# Altium PCB PCB1.PcbDoc (part 4 of 4)
Units mm, origin at the board's own origin, x right, y up, seen from the top; angles counter-clockwise.
Board outline 134.12 x 116.9 mm, 4 copper layers (Top Layer, Layer 1, Layer 2, Bottom Layer), stack 1.312 mm thick; 317 components, 155 nets, 807 pads, 898 vias.
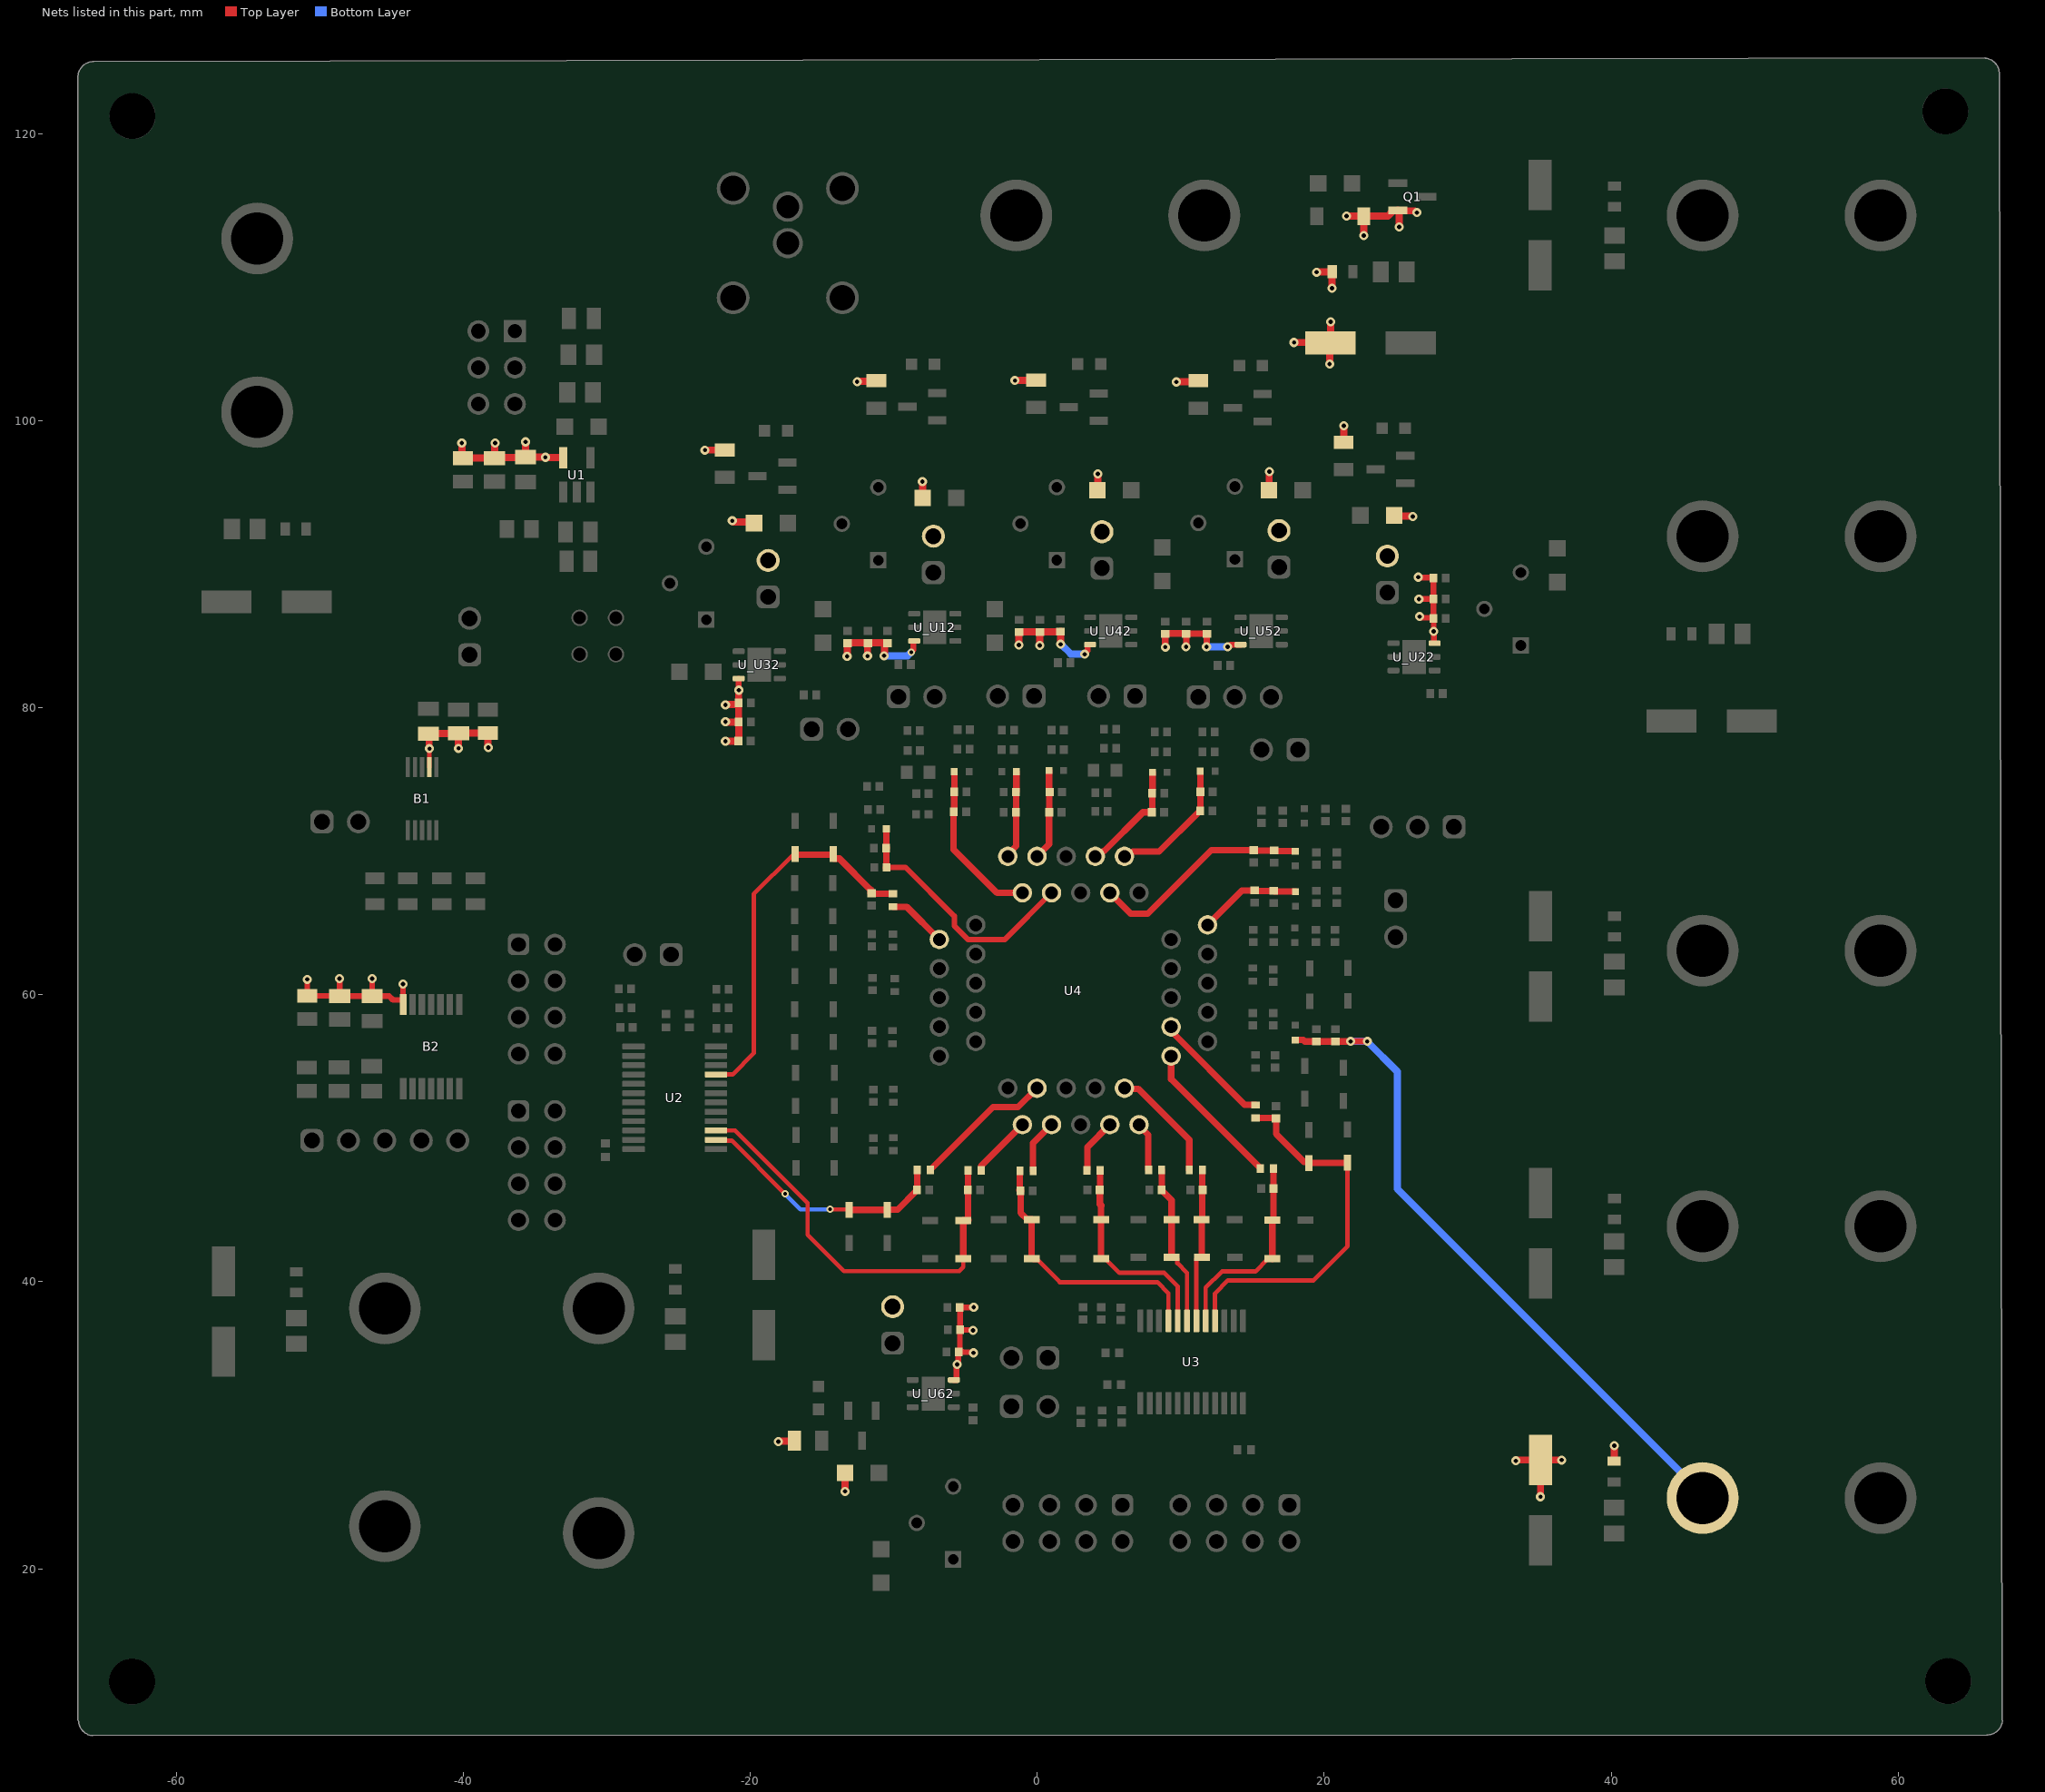
[diagram p6: the nets of this part, all layers, seen from the top]

## Via types
v1: diameter 0.635, hole 0.305, Top Layer to Bottom Layer, 880 vias
v2: diameter 0.508, hole 0.254, Top Layer to Bottom Layer, 17 vias
v3: diameter 0.504, hole 0.254, Top Layer to Bottom Layer, 1 vias

## Nets (pads, with @x,y where several pads share a name; then routed paths per layer and width w, separated by ;. In a path a pad name is that pad's centre, name@x,y a point inside that pad or via, vN(x,y) a via of type N, cw(c..) or ccw(c..) an arc to the next point about the centre after c; other vN are vias at no path point) (continued)
VDD_5V_U1: B1.2 B2.14 C3.2 C4.2 C5.2 C6.2 C7.2 C8.2 C11.2 C12.2 C75.1 C81.2 C_U183.2 C_U184.2 C_U185.2 C_U283.2 C_U284.2 C_U285.2 C_U383.2 C_U384.2 C_U385.2 C_U483.2 C_U484.2 C_U485.2 C_U583.2 C_U584.2 C_U585.2 C_U683.2 C_U684.2 C_U685.2 D10.1 J_U127.2 J_U227.2 J_U327.2 J_U427.2 J_U527.2 J_U627.2 Q1.2 R40.2 R_U131.1 R_U132.2 R_U231.1 R_U232.2 R_U331.1 R_U332.2 R_U431.1 R_U432.2 R_U531.1 R_U532.2 R_U631.1 R_U632.2 U1.5 U_U12.6 U_U22.6 U_U32.6 U_U42.6 U_U52.6 U_U62.6 | length 109.7
  Top Layer w0.3: B1.2@-42.363,75.865 -42.363,77.137 v1(-42.35,77.15)
  Top Layer w0.4: v1(-50.875,61.075) -50.866,61.066 -50.866,59.936 -50.852,59.922 -48.722,59.922 C11.2@-48.65,59.85 ; v1(-48.625,61.125) -48.616,61.116 -48.616,59.866 C11.2@-48.55,59.8 ; C11.2@-48.607,59.917 C11.2@-48.607,59.917 C81.2@-46.351,59.916 ; v1(-46.35,61.125) -46.351,61.124 -46.351,60.001 C81.2@-46.265,59.915 ; C81.2@-46.113,59.915 C81.2@-46.353,59.915 -46.348,59.91 -45.16,59.91 -44.89,59.64 -44.208,59.64 -44.183,59.615 B2.14@-44.183,59.326 ; B2.14@-44.2,59.814 v1(-44.2,60.75) ; v1@-20.805,81.23 U_U32.6@-20.805,82.035 ; v2(-8.775,83.875) v2(-8.775,83.875) -8.633,84.019 U_U12.6@-8.633,84.602 ; U_U62.6@-5.809,33.16 -5.62,33.16 -5.62,34.205 -5.506,34.319 -5.506,34.789 -5.495,34.8 ; C_U685.2@-5.45,35.15 -5.395,35.205 C_U684.2@-5.395,36.65 ; C_U683.2@-5.425,38.2 -5.413,38.212 -4.438,38.212 v1(-4.425,38.225) ; C_U685.2@-5.398,35.125 -5.398,35.121 -5.18,35.121 -5.154,35.095 -4.495,35.095 v1(-4.45,35.05) ; C_U684.2@-5.373,36.65 C_U683.2@-5.373,38.1 ; C_U684.2@-5.325,36.675 -5.301,36.651 -4.501,36.651 v1(-4.475,36.625) ; v1(3.3,83.725) 3.3,83.762 3.514,83.976 U_U42.6@3.514,84.351 ; v1(13.275,84.25) 13.339,84.25 13.485,84.397 U_U52.6@14.172,84.397 ; v1(26.55,89.1) 26.588,89.062 27.588,89.062 C_U283.2@27.626,89.024 ; v1(26.6,87.575) 26.609,87.584 27.591,87.584 C_U284.2@27.6,87.575 ; v1(26.65,86.35) 26.714,86.35 26.789,86.275 27.55,86.275 C_U285.2@27.575,86.25 ; C_U284.2@27.608,87.558 27.608,86.236 27.625,86.219 v1(27.625,85.325) 27.651,85.299 U_U22.6@27.651,84.54 ; C_U284.2@27.608,87.594 27.608,89.007 C_U283.2@27.63,89.029
  Top Layer w0.45: v1(8.925,84.225) C_U583.2@8.925,85.176 ; C_U583.2@8.926,85.175 C_U584.2@10.35,85.175 ; v1(10.375,84.25) 10.382,84.257 10.382,85.143 C_U584.2@10.35,85.175 ; C_U584.2@10.375,85.175 C_U584.2@10.35,85.175 ; C_U584.2@10.382,85.167 10.389,85.174 C_U585.2@11.799,85.174 ; v1(11.8,84.25) 11.812,84.262 11.812,85.163 C_U585.2@11.825,85.176
  Top Layer w0.5: v1@-42.376,77.151 -42.376,78.131 C8.2@-42.425,78.18 -42.4,78.205 C7.2@-40.325,78.205 ; v1@-40.3,77.175 -40.325,77.2 C7.2@-40.325,78.205 ; C7.2@-40.15,78.25 C7.2@-40.165,78.235 ; v1(-40.1,98.45) -40.074,98.424 -40.074,97.574 C3.2@-40.025,97.525 ; C3.2@-40.025,97.385 -40.02,97.39 -37.915,97.39 C4.2@-37.9,97.375 ; v1@-38.3,77.275 -38.275,77.3 C6.2@-38.275,78.235 ; C6.2@-38.275,78.24 C6.2@-38.275,78.235 ; C6.2@-38.1,78.225 -38.11,78.235 C6.2@-38.275,78.235 ; C4.2@-37.825,97.395 -37.788,97.432 -35.688,97.432 C5.2@-35.65,97.47 ; v1(-37.775,98.45) -37.8,98.425 -37.8,97.525 C4.2@-37.725,97.45 ; C5.2@-35.65,97.55 v1(-35.65,98.525) ; C5.2@-35.575,97.4 -35.512,97.463 -35.51,97.46 -34.285,97.46 -34.256,97.431 -33.057,97.431 U1.5@-33.057,97.5 ; v1(-23.15,97.95) -23.147,97.953 -21.955,97.953 R_U332.2@-21.952,97.95 ; v1(-21.725,77.675) C_U383.2@-20.827,77.675 C_U383.2@-20.827,77.675 ; v1(-21.725,79.025) -21.699,78.999 C_U384.2@-20.802,78.999 ; v1(-21.725,80.2) -21.699,80.226 -20.949,80.226 -20.9,80.275 -20.827,80.275 -20.825,80.277 C_U385.2@-20.825,80.35 ; v1(-21.25,93.025) -21.168,92.943 -19.812,92.943 R_U331.1@-19.73,92.862 ; C_U384.2@-20.825,79.1 C_U384.2@-20.8,79.075 ; C_U385.2@-20.809,80.528 -20.809,79.098 C_U384.2@-20.808,79.099 ; v1@-20.805,81.225 -20.805,80.545 C_U385.2@-20.787,80.528 ; C_U383.2@-20.802,77.7 C_U384.2@-20.802,78.999 ; C_U384.2@-20.802,79.025 C_U384.2@-20.802,78.999 ; C_U384.2@-20.775,78.975 -20.799,78.999 C_U384.2@-20.802,78.999 ; v1(-18.05,28.875) -18.024,28.901 -16.844,28.901 R_U632.2@-16.83,28.914 ; v1(-13.4,25.4) -13.392,25.408 -13.392,26.667 R_U631.1@-13.384,26.675 ; v1(-13.25,83.575) -13.233,83.592 -13.233,84.498 -13.211,84.52 -11.82,84.52 C_U184.2@-11.802,84.502 ; v1(-12.55,102.725) -12.524,102.751 -11.268,102.751 R_U132.2@-11.2,102.683 ; C_U184.2@-11.849,84.479 -11.828,84.5 C_U184.2@-11.802,84.502 ; v1(-11.825,83.6) -11.825,84.477 C_U184.2@-11.802,84.502 ; C_U184.2@-11.802,84.524 -11.799,84.521 C_U184.2@-11.781,84.521 ; C_U184.2@-11.775,84.525 -11.777,84.525 C_U184.2@-11.781,84.521 ; v1@-10.7,83.625 -10.649,83.676 -10.649,84.318 -10.498,84.469 -10.498,84.474 C_U185.2@-10.497,84.475 ; C_U185.2@-10.45,84.475 C_U185.2@-10.497,84.475 ; C_U185.2@-10.45,84.5 -10.458,84.508 -10.461,84.511 -10.471,84.521 C_U184.2@-11.781,84.521 ; C_U185.2@-10.448,84.519 -10.453,84.519 C_U185.2@-10.497,84.475 ; v1(-8,95.75) -7.996,95.746 -7.996,94.615 R_U131.1@-7.991,94.61 ; v1(-1.55,102.8) -1.533,102.817 -0.343,102.817 R_U432.2@-0.33,102.83 ; v1(-1.275,84.375) -1.268,84.382 C_U483.2@-1.268,85.293 ; C_U483.2@-1.261,85.278 C_U484.2@0.187,85.278 ; v1(0.175,84.35) 0.187,84.362 C_U484.2@0.187,85.278 ; C_U485.2@1.594,85.282 1.573,85.282 1.569,85.278 C_U484.2@0.187,85.278 ; C_U485.2@1.624,85.328 1.624,84.426 v1(1.625,84.425) ; R_U431.1@3.872,94.925 4.213,95.265 4.213,96.288 v1(4.225,96.3) ; v1(9.7,102.7) 9.726,102.726 11.126,102.726 R_U532.2@11.2,102.8 ; R_U531.1@16.15,95.15 16.163,95.163 16.163,96.462 v1@16.175,96.475 ; v1(17.9,105.45) 20.406,105.45 C75.1@20.431,105.425 20.45,105.444 v1(20.45,106.9) v1@20.45,106.925 ; v1(19.475,110.35) 19.49,110.365 20.541,110.365 R40.2@20.556,110.38 ; v1(20.375,103.95) C75.1@20.375,105.425 ; v1(20.55,109.225) 20.553,109.228 R40.2@20.553,110.328 ; R_U232.2@21.375,98.4 21.362,98.412 21.362,99.637 v1(21.375,99.65) ; v1@21.55,114.25 D10.1@22.675,114.25 ; v1(22.75,112.9) 22.753,112.903 D10.1@22.753,114.203 ; D10.1@22.755,114.251 24.431,114.251 24.724,114.544 24.724,114.621 24.753,114.65 Q1.2@25.134,114.65 ; D10.1@22.8,114.25 D10.1@22.825,114.275 ; R_U231.1@24.8,93.275 24.876,93.351 26.149,93.351 v1(26.175,93.325) ; Q1.2@25.125,114.675 25.179,114.621 26.293,114.621 26.413,114.5 v1(26.45,114.5) ; Q1.2@25.2,114.6 25.225,114.575 v1(25.225,113.5) ; C7.2@-40.325,78.205 C7.2@-40.325,78.23 -40.32,78.235 C7.2@-40.165,78.235 ; C7.2@-40.325,78.205 -40.195,78.205 C7.2@-40.165,78.235 ; C7.2@-40.165,78.235 C6.2@-38.275,78.235 ; C_U184.2@-11.802,84.502 -11.8,84.5 C_U184.2@-11.802,84.502 ; C_U184.2@-11.802,84.502 C_U184.2@-11.802,84.502 ; C_U184.2@-11.802,84.502 C_U184.2@-11.781,84.521
  Bottom Layer w0.5: v1(-10.675,83.625) -9.027,83.625 -8.777,83.875 v2(-8.775,83.875) ; v1(1.625,84.425) 1.662,84.425 2.336,83.751 3.274,83.751 v1(3.3,83.725) ; v1(11.8,84.25) v1@13.225,84.25
  other v1: -5.575,34.25 -40.325,77.175 -38.25,77.225 -20.8,81.225 16.175,96.45 -34.275,97.45 21.55,114.25
VDD_DNW_B: C16.1 C17.2 C18.2 J17.1 R8.1 R34.2 | length 54.3
  Top Layer w0.45: R8.1@17.982,56.848 18.552,56.848 18.652,56.748 C18.2@19.46,56.748 C17.2@20.775,56.748 20.776,56.749 21.849,56.749 v1(21.85,56.75) v1(23,56.75)
  Top Layer w0.5: v1(33.35,27.525) 33.387,27.525 33.446,27.585 34.525,27.585 35.075,27.035 v1(35.075,25.025) ; C16.1@35.175,27.135 35.625,27.585 v1(36.55,27.585) ; R34.2@40.175,27.58 40.212,27.58 40.212,28.562 v1(40.225,28.575)
  Bottom Layer w0.5: v1(21.85,56.75) v1(23,56.75) 25.1,54.65 25.1,46.475 46.375,25.2 J17.1@46.375,24.941
VDD_ERS_DRAIN_SAFE: C98.2 C99.2 R20.2 U4.5 | length 6.2
  Top Layer w0.45: U4.5@-2.08,69.665 -2.08,69.759 -1.478,70.361 C99.2@-1.478,72.725 C98.2@-1.478,74.125 ; C98.2@-1.5,74.125 -1.45,74.175 R20.2@-1.45,75.55
VDD_HS_DRAIN_SAFE: C92.2 C93.2 R16.2 U4.4 | length 11.5
  Top Layer w0.45: C93.2@-5.796,72.8 -5.825,72.8 -5.825,70.125 -2.807,67.107 U4.4@-1.032,67.107 ; C93.2@-5.782,72.775 C92.2@-5.782,74.15 ; C92.2@-5.774,74.158 R16.2@-5.774,75.55
VDD_PRG_DRAIN_SAFE: C94.2 C95.2 R18.2 U4.3 | length 6.3
  Top Layer w0.45: U4.3@-0.016,69.647 0.825,70.488 C95.2@0.825,72.725 ; R18.2@0.826,75.625 0.826,74.172 C94.2@0.873,74.125 ; C95.2@0.843,72.725 0.843,72.983 C94.2@0.843,74.125
VDD_PRG_GATE_SAFE: C51.2 C52.2 R10.2 U4.37 | length 9.4
  Top Layer w0.45: U4.37@6.08,69.647 6.324,69.647 6.652,69.975 8.5,69.975 11.275,72.75 11.323,72.75 11.363,72.79 C51.2@11.363,74.15 ; C51.2@11.363,74.155 R10.2@11.363,75.575
VDD_READ_DRAIN_SAFE: C86.2 C87.2 R13.2 U4.2 | length 18.1
  Top Layer w0.38: C87.2@-10.493,68.875 -9.175,68.875 -5.775,65.475 -5.775,64.8 -4.832,63.857 -2.25,63.857 U4.2@1,67.107
  Top Layer w0.45: C86.2@-10.521,70.225 R13.2@-10.521,71.6 ; C87.2@-10.513,68.862 C86.2@-10.513,70.225
  Top Layer w0.5: C86.2@-10.546,70.25 C86.2@-10.521,70.225 ; C87.2@-10.525,68.85 C87.2@-10.513,68.862
VNEG_ERASE_GATE_SAFE: C96.2 C97.2 R19.2 U4.39 | length 8
  Top Layer w0.45: U4.39@4.016,69.665 4.26,69.665 4.615,70.02 4.67,70.02 7.369,72.719 7.987,72.719 C97.2@7.993,72.725 ; C96.2@7.998,74.05 8.023,74.075 8.023,74.296 8.038,74.311 R19.2@8.038,75.5 ; C97.2@8.015,72.775 C96.2@8.015,74.045
VNEG_GATE_SAFE: C55.2 C60.2 R11.2 U4.38 | length 15.3
  Top Layer w0.45: U4.38@5.064,67.107 6.521,65.65 7.702,65.65 12.129,70.077 C60.2@15.1,70.077 ; C60.2@15.1,70.055 C55.2@16.475,70.055 ; C55.2@16.5,70.052 16.54,70.012 R11.2@17.982,70.012
VREAD_GATE_SAFE: C69.2 C73.2 R12.2 U4.35 | length 7.2
  Top Layer w0.45: U4.35@11.871,64.872 14.249,67.25 C73.2@15.225,67.25 ; C73.2@15.175,67.23 C69.2@16.475,67.23 ; C69.2@16.475,67.252 16.525,67.202 17.988,67.202 R12.2@17.998,67.192
WL0: C_U265.2 D_U23.2 D_U24.1 R_U228.1 U2.15 | length 29.8
  Top Layer w0.3: U2.15@-22.386,50.545 -21.045,50.545 -16,45.5 -16,43.275 -13.475,40.75 -5.423,40.75 -5.15,41.023 D_U23.2@-5.15,41.625
  Top Layer w0.45: D_U23.2@-5.15,41.625 D_U24.1@-5.15,44.275 ; D_U24.1@-4.819,44.306 R_U228.1@-4.819,47.77
  Top Layer w0.5: D_U24.1@-5.15,44.275 -4.85,44.275 D_U24.1@-4.819,44.306
WL0-SAFE: R_U228.2 U4.17 | length 4.4
  Top Layer w0.45: R_U228.2@-3.905,47.77 -3.905,48.079 U4.17@-1.032,50.953
WL1: C_U267.2 D_U27.2 D_U28.1 R_U230.1 U2.14 | length 17.9
  Top Layer w0.3: U2.14@-22.386,49.895 -22.331,49.84 -21.29,49.84 v2(-17.575,46.125) ; v2(-14.425,45.05) -13.148,45.05 D_U27.2@-13.113,45.016
  Top Layer w0.45: D_U27.2@-13.113,45.016 D_U28.1@-10.439,45.016 ; D_U28.1@-10.439,45.038 -9.731,45.038 C_U267.2@-8.409,46.361 ; C_U267.2@-8.364,46.433 R_U230.1@-8.364,47.796
  Top Layer w0.5: D_U28.1@-10.439,45.016 D_U28.1@-10.439,45.038
  Bottom Layer w0.3: v2(-17.575,46.125) -16.5,45.05 v2(-14.425,45.05)
WL1-SAFE: R_U230.2 U4.18 | length 9.8
  Top Layer w0.45: R_U230.2@-7.45,47.796 -7.45,47.851 -7.43,47.871 -7.375,47.871 -3.071,52.175 -1.334,52.175 U4.18@-0.016,53.493
WL2: C_U364.2 D_U31.2 D_U32.1 R_U327.1 U3.21 | length 19.1
  Top Layer w0.3: D_U31.2@-0.381,41.625 -0.281,41.525 0.019,41.525 1.569,39.975 8.375,39.975 9.141,39.209 U3.21@9.141,37.28
  Top Layer w0.45: C_U364.2@-1.203,46.391 R_U327.1@-1.203,47.735 ; C_U364.2@-1.151,46.334 -1.151,44.795 D_U32.1@-0.681,44.325 ; D_U31.2@-0.381,41.625 D_U32.1@-0.381,44.325
  Top Layer w0.5: C_U364.2@-1.203,46.391 -1.151,46.339 C_U364.2@-1.151,46.334 ; D_U32.1@-0.681,44.325 D_U32.1@-0.381,44.325
WL2-SAFE: R_U327.2 U4.19 | length 3.8
  Top Layer w0.45: R_U327.2@-0.289,47.735 -0.289,49.663 U4.19@1,50.953
WL3: C_U366.2 D_U35.2 D_U36.1 R_U329.1 U3.20 | length 14.8
  Top Layer w0.3: D_U35.2@4.45,41.625 4.75,41.625 4.85,41.525 4.85,41.506 5.731,40.625 8.85,40.625 9.791,39.684 U3.20@9.791,37.28
  Top Layer w0.45: C_U366.2@4.348,46.395 4.383,46.43 R_U329.1@4.383,47.766 ; 4.371,45.404 C_U366.2@4.371,46.35 ; D_U35.2@4.45,41.625 D_U36.1@4.45,44.325 4.45,45.325
  Top Layer w0.5: C_U366.2@4.326,46.395 C_U366.2@4.371,46.35 ; 4.371,45.404 4.45,45.325
WL3-SAFE: R_U329.2 U4.23 | length 3.8
  Top Layer w0.45: R_U329.2@3.489,47.841 3.489,49.378 U4.23@5.064,50.953
WL4: C_U365.2 D_U33.2 D_U34.1 R_U328.1 U3.18 | length 10.8
  Top Layer w0.3: U3.18@11.091,37.28 11.091,41.6 11.191,41.7 D_U33.2@11.475,41.7
  Top Layer w0.45: D_U33.2@11.461,41.7 D_U34.1@11.461,44.325 ; D_U34.1@11.507,44.325 R_U328.1@11.507,47.796
WL4-SAFE: R_U328.2 U4.24 | length 8.1
  Top Layer w0.45: U4.24@6.08,53.493 6.121,53.452 7.048,53.452 10.6,49.9 R_U328.2@10.6,47.785
WL5: C_U367.2 D_U37.2 D_U38.1 R_U330.1 U3.19 | length 11.4
  Top Layer w0.3: D_U37.2@9.366,41.7 9.666,41.7 9.766,41.6 9.766,41.3 10.441,40.625 U3.19@10.441,37.28
  Top Layer w0.45: C_U367.2@8.646,46.406 9.366,45.686 D_U38.1@9.366,44.325 D_U37.2@9.366,41.7 ; C_U367.2@8.675,46.417 R_U330.1@8.675,47.796
WL5-SAFE: R_U330.2 U4.25 | length 3.4
  Top Layer w0.45: U4.25@7.064,50.971 7.064,50.938 7.745,50.257 R_U330.2@7.745,47.812
WL_MODE_1: C_U164.2 D_U11.2 D_U12.1 R_U127.1 U3.17 | length 14.1
  Top Layer w0.3: U3.17@11.741,37.28 11.741,39.591 12.875,40.725 15.208,40.725 16.083,41.6 D_U11.2@16.383,41.6
  Top Layer w0.45: D_U11.2@16.385,41.6 D_U12.1@16.385,44.3 16.44,44.3 16.465,44.325 C_U164.2@16.465,46.484 ; C_U164.2@16.454,46.495 R_U127.1@16.454,47.88
WL_MODE_1-SAFE: R_U127.2 U4.26 | length 10.3
  Top Layer w0.45: 9.331,54.144 R_U127.2@15.487,47.988
  Top Layer w0.5: 9.331,54.144 U4.26@9.331,55.728
WL_MODE_2: C_U166.2 D_U15.2 D_U16.1 R_U129.1 U3.16 | length 26.7
  Top Layer w0.3: U3.16@12.391,37.28 12.391,39.191 13.3,40.1 19.25,40.1 21.625,42.475 D_U15.2@21.625,48.275
  Top Layer w0.45: R_U129.1@15.231,51.408 C_U166.2@16.651,51.408 ; C_U166.2@16.652,51.406 16.652,50.298 18.6,48.35 18.925,48.35 D_U16.1@18.925,48.275 D_U15.2@21.625,48.275
WL_MODE_2-SAFE: R_U129.2 U4.28 | length 8.3
  Top Layer w0.45: U4.28@9.331,57.76 9.504,57.588 9.504,57.296 14.457,52.343 15.21,52.343 R_U129.2@15.23,52.323
WLINPUT: C_U464.2 D_U41.2 D_U42.1 R_U427.1 U2.21 | length 26.4
  Top Layer w0.3: U2.21@-22.386,54.445 -22.38,54.452 -21.223,54.452 -19.75,55.925 -19.75,67.025 D_U41.2@-17.052,69.723
  Top Layer w0.45: D_U41.2@-16.889,69.765 D_U42.1@-14.235,69.765 ; D_U42.1@-14.21,69.64 -14.21,69.515 -14.185,69.49 -13.79,69.49 -11.611,67.311 -11.611,67.12 C_U464.2@-11.586,67.12 ; C_U464.2@-11.514,67.048 R_U427.1@-10.049,67.048
  Top Layer w0.5: C_U464.2@-11.586,67.286 -11.586,67.095 -11.561,67.07 C_U464.2@-11.536,67.07
WLINPUT-SAFE: R_U427.2 U4.7 | length 4.2
  Top Layer w0.45: R_U427.2@-10.049,66.134 -9.101,66.134 U4.7@-6.823,63.856
pads on no net: B2.6 B2.9 J2.2 R_U143.1 R_U243.1 R_U343.1 R_U443.1 R_U543.1 R_U643.1 U4.8 U4.10 U4.12 U4.14 U4.20 U4.21 U4.22 U4.27 U4.30 U4.36

## Polygon pours and split planes (outlines as drawn)
VDD_5V_U1 on Layer 2 "VDD_5V_U1_L03_P078" (solid, pour order 78): 68.55,125.975 -68.025,125.975 -68.025,7.875 68.55,7.875
+0.8V on Layer 2 "+0.8V" (solid, pour order 68): -39.95,28.325 -21.252,28.325 -21.252,40.95 -3.084,40.95 2.699,35.167 21.242,35.167 21.242,73.6 8.641,79.111 7,79.111 -14.385,79.111 -39.95,54.507
+0.3V on Layer 2 "+0.3V_L03_P076" (solid, pour order 76): 67.4,54.6 21.35,54.6 21.35,33.975 67.4,33.975
-0.2V on Layer 2 "-0.2V_L03_P067" (solid, pour order 67): 67.425,69.975 18.725,69.975 18.725,67.5 21.375,67.5 21.375,54.6 67.4,54.6
+6V on Layer 2 "+6V_L03_P074" (solid, pour order 74): 67.425,101.425 39.6,101.425 39.6,78.275 21.35,78.275 21.35,69.975 67.425,69.975
-2V on Layer 2 "-2V_L03_P073" (solid, pour order 73): 29.825,125.75 67.425,125.75 67.5,125.675 67.425,101.425 29.825,101.425
VDD_DNW_B on Layer 2 "VDD_DNW_B_L03_P077" (solid, pour order 77): 67.4,33.975 21.35,33.975 21.35,8.266 67.4,8.266
+0.05V on Layer 2 "+0.05V_L03_P070" (solid, pour order 70): -66.867,125.275 -42.425,125.275 -42.425,86.078 -55.505,74.7 -66.867,74.7
+5V-Unfiltered on Layer 2 "+5V-UNFILTERED_L03_P071" (solid, pour order 71): -6.4,125.525 29.85,125.525 29.85,115.15 17.1,115.15 17.025,115.15 17.025,108.275 -6.375,108.275 -6.4,108.25
CHIPS_VSS on Top Layer "CHIPS_VSS_L01_P072" (solid, remove dead copper, pour order 72): -68.108,125.275 69.95,125.275 69.95,7.8 -68.536,7.8
ADC_EXT on Top Layer "ADC_EXT_L01_P069" (solid, pour order 69): -66.897,46.125 -40.025,46.125 -40.025,28.25 -66.88,28.25
CHIPS_VSS on Layer 1 "CHIPS_VSS_L02_P066" (solid, pour order 66): -67.941,125.575 69.15,125.575 69.15,7.95 -68.48,7.95
CHIPS_VSS on Bottom Layer "CHIPS_VSS_L04_P075" (solid, pour order 75): -68.064,125.45 68.55,125.45 68.55,7.9 -68.177,7.9

## Silkscreen, mask and mechanical layers (free items; w line width, h text height)
Top Overlay:
  text "+5V" at 9.643,108.774 h1.5
  text "VSS" at -3.38,108.724 h1.5
  text "-2V" at 44.375,108.724 h1.5
  text "VSS" at 56.815,108.736 h1.5
  text "VSS" at -56.378,107.108 h1.5
  text "100pF" at -44.425,105.917 h0.8
  text "22pF" at -43.925,103.392 h0.8
  text "4.7pF" at -44.6,100.867 h0.8
  text "+0.05V" at -58.578,95.025 h1.5
  text "TIA->ADC" at -37.875,87.6 h0.8 r270
  text "+6V" at 44.275,86.397 h1.5
  text "VSS" at 56.766,86.381 h1.5
  text "VDD_READ_DRAIN" at -33.319,80.119 h0.8 r315
  text "ADC_EXT" at -51.325,73.758 h0.8
  text "LS_nOE1" at -28.825,64.483 h0.8
  text "VSS" at 56.7,57.555 h1.5
  text "-0.2V" at 43,57.505 h1.5
  text "ADC_SPI" at -51.95,47.383 h0.8
  text "VSS" at 56.7,38.315 h1.5
  text "+0.3V" at 42.975,38.29 h1.5
  text "LS_nOE2" at -3.175,36.433 h0.8
  text "+0.8V" at -33.959,32.602 h1.5
  text "+ADC_EXT" at -51.213,32.57 h1.5
  text "+DNW" at 43.5,19.391 h1.5
  text "VSS" at 56.803,19.375 h1.5
  text "VSS" at -47.435,17.402 h1.5
  text "VSS" at -32.759,16.866 h1.5
  text "CHIPS NeuroCTT November 2026" at -20.575,12.55 h1.5
Top Solder:
  circle w2.25: c-63.05,121.225 r1.125
  circle w2.25: c63.475,12.175 r1.125
  circle w2.25: c-63.075,12.15 r1.125
  circle w2.25: c63.275,121.55 r1.125
Bottom Solder:
  circle w2.25: c-63.05,121.225 r1.125
  circle w2.25: c63.475,12.175 r1.125
  circle w2.25: c-63.075,12.15 r1.125
  circle w2.25: c63.275,121.55 r1.125
Board:
  lines w0.1: -187.469,127.029 cw(c-186.433,126.954) -186.427,127.992 ; -182.819,125.804 cw(c-181.783,125.729) -181.777,126.767 ; -66.8,9.475 -66.8,124 ; -66.792,124.011 cw(c-65.756,123.936) -65.75,124.975 ; -66.764,9.467 ccw(c-65.725,9.461) -65.8,8.425 ; -65.775,124.974 66.05,125.225 ; -65.75,8.425 66.225,8.477 ; 66.036,125.217 cw(c65.961,124.181) 67,124.175 ; 66.175,8.475 ccw(c66.181,9.514) 67.217,9.439 ; 66.989,124.175 67.204,9.4

## Text inside footprints (layer, text, board x,y; h text height)
C14: Top Overlay "+" at -54.3,42.225 h1.27 r90; Top Assembly "+" at -54.3,42.225 h1.27 r90
C16: Top Overlay "+" at 37.475,29.085 h1.27 r90; Top Assembly "+" at 37.475,29.085 h1.27 r90
C31: Top Overlay "+" at 42.7,81.475 h1.27 r180; Top Assembly "+" at 42.7,81.475 h1.27 r180
C33: Top Overlay "+" at -49.403,84.975 h1.27; Top Assembly "+" at -49.403,84.975 h1.27
C57: Top Overlay "+" at 37.475,66.98 h1.27 r90; Top Assembly "+" at 37.475,66.98 h1.27 r90
C70: Top Overlay "+" at 37.475,47.686 h1.27 r90; Top Assembly "+" at 37.475,47.686 h1.27 r90
C75: Top Overlay "+" at 18.931,107.825 h1.27 r180; Top Assembly "+" at 18.931,107.825 h1.27 r180
C79: Top Overlay "+" at 37.441,117.925 h1.27 r90; Top Assembly "+" at 37.441,117.925 h1.27 r90
C104: Top Overlay "+" at -16.65,43.375 h1.27 r90; Top Assembly "+" at -16.65,43.375 h1.27 r90
D_U19: Top Overlay "+" at -6.362,103.623 h0.61; Top Assembly "+" at -6.362,103.623 h0.61
D_U29: Top Overlay "+" at 26.438,99.175 h0.61; Top Assembly "+" at 26.438,99.175 h0.61
D_U39: Top Overlay "+" at -16.6,99 h0.61; Top Assembly "+" at -16.6,99 h0.61
D_U49: Top Overlay "+" at 5.225,103.65 h0.61; Top Assembly "+" at 5.225,103.65 h0.61
D_U59: Top Overlay "+" at 16.495,103.539 h0.61; Top Assembly "+" at 16.495,103.539 h0.61
D_U69: Top Overlay "+" at -15.534,30.31 h0.61 r270; Top Assembly "+" at -15.534,30.31 h0.61 r270
U4: Top Overlay "03458 401 X215_PTH" at -5.519,54.575 h0.8